# Altium PCB BOARD_4LAYER.PcbDoc (part 5 of 21)
Units mil, origin at the board's own origin, x right, y up, seen from the top; angles counter-clockwise.
Board outline 6692.91 x 10039.37 mil, 4 copper layers (Top Layer, Mid Layer 1, Mid Layer 2, Bottom Layer), stack 66.299 mil thick; 1532 components, 908 nets, 4105 pads, 1286 vias.
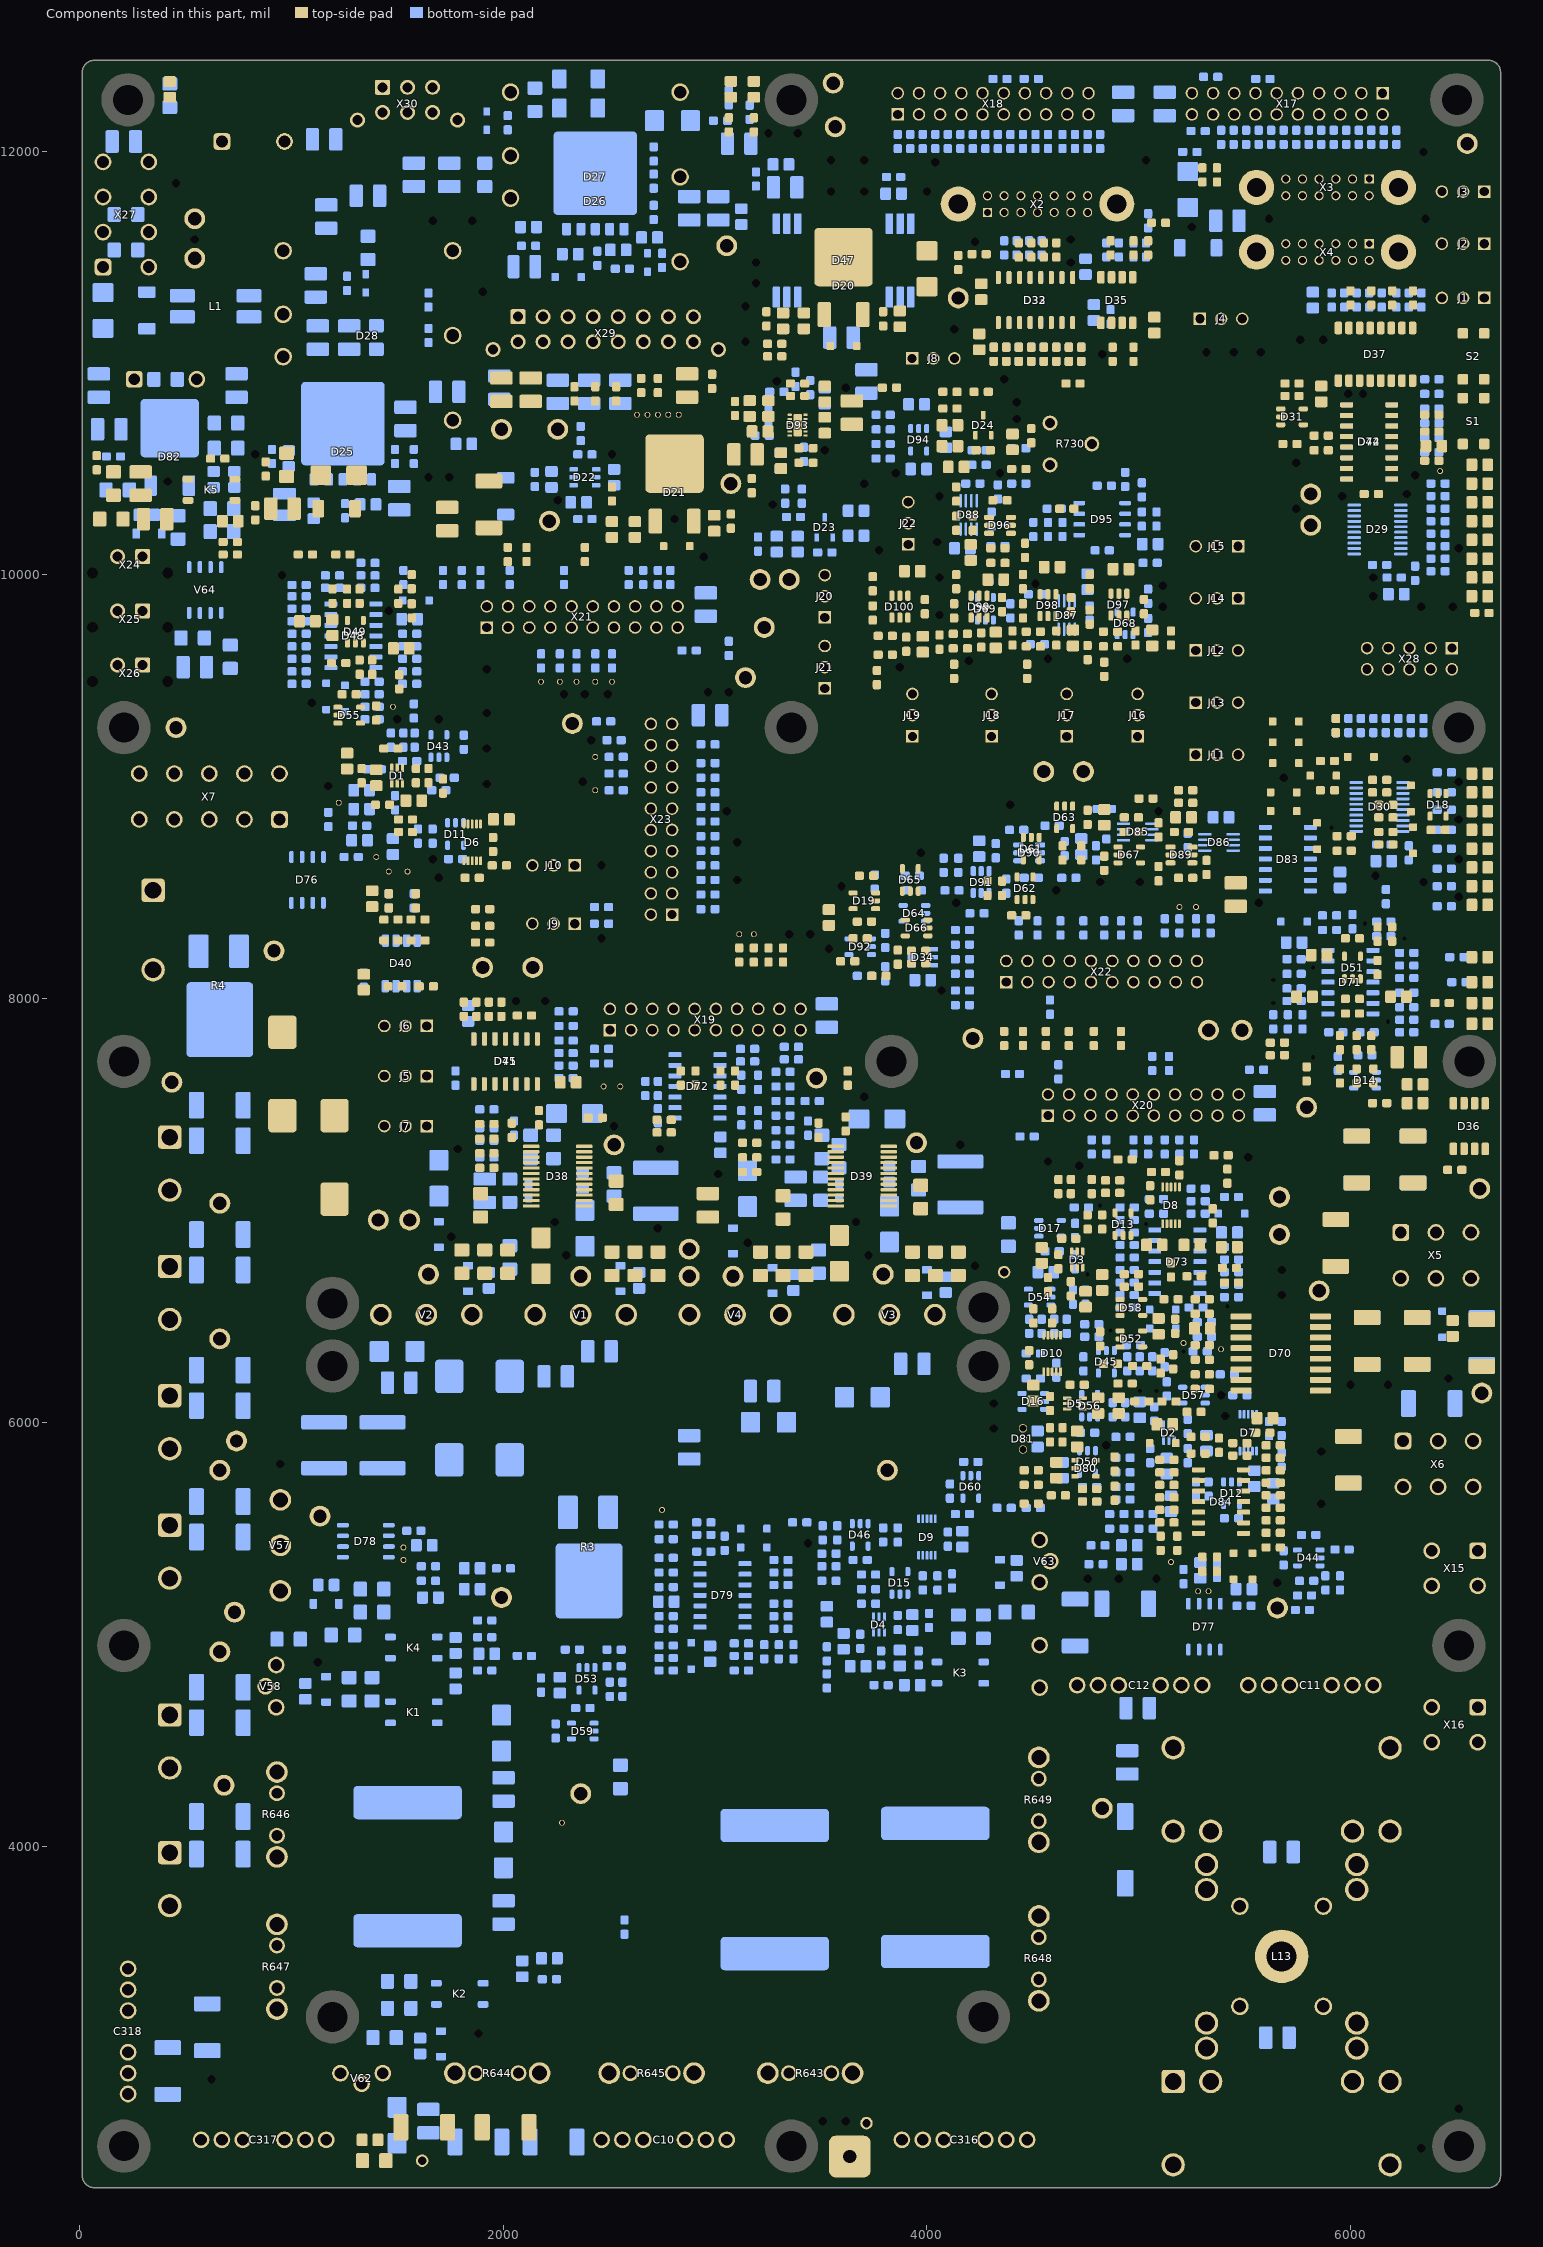
[diagram p7: the components of this part, seen from the top]

## Design rules (kind name [scope] priority, off if disabled: settings) (continued)
PolygonConnect PolygonConnect_In_$2N3800_L01_P385 [IsNamedPolygon('$2N3800_L01_P385')] p388: thpad.connectstyle=Relief thpad.reliefconductorwidth=19.68 thpad.reliefentries=4 thpad.polygonreliefangle="90 Angle" thpad.airgapwidth=9.84 smdpad.connectstyle=Relief smdpad.reliefconductorwidth=19.68 smdpad.reliefentries=4 smdpad.polygonreliefangle="90 Angle" smdpad.airgapwidth=9.84 via.connectstyle=Direct via.reliefconductorwidth=5.12 via.reliefentries=2 via.polygonreliefangle="90 Angle" via.airgapwidth=0
PolygonConnect PolygonConnect_In_$2N3800_L-01_P383 [IsNamedPolygon('$2N3800_L-01_P383')] p389: thpad.connectstyle=Relief thpad.reliefconductorwidth=19.68 thpad.reliefentries=4 thpad.polygonreliefangle="90 Angle" thpad.airgapwidth=9.84 smdpad.connectstyle=Relief smdpad.reliefconductorwidth=19.68 smdpad.reliefentries=4 smdpad.polygonreliefangle="90 Angle" smdpad.airgapwidth=9.84 via.connectstyle=Direct via.reliefconductorwidth=5.12 via.reliefentries=2 via.polygonreliefangle="90 Angle" via.airgapwidth=0
PolygonConnect PolygonConnect_In_+U_POWER_L-01_P124 [IsNamedPolygon('+U_POWER_L-01_P124')] p390: thpad.connectstyle=Relief thpad.reliefconductorwidth=19.68 thpad.reliefentries=4 thpad.polygonreliefangle="90 Angle" thpad.airgapwidth=9.84 smdpad.connectstyle=Relief smdpad.reliefconductorwidth=19.68 smdpad.reliefentries=4 smdpad.polygonreliefangle="90 Angle" smdpad.airgapwidth=9.84 via.connectstyle=Direct via.reliefconductorwidth=5.12 via.reliefentries=2 via.polygonreliefangle="90 Angle" via.airgapwidth=0
PolygonConnect PolygonConnect_In_~U_TS_L02_P133 [IsNamedPolygon('~U_TS_L02_P133')] p391: thpad.connectstyle=Relief thpad.reliefconductorwidth=19.68 thpad.reliefentries=4 thpad.polygonreliefangle="90 Angle" thpad.airgapwidth=9.84 smdpad.connectstyle=Relief smdpad.reliefconductorwidth=19.68 smdpad.reliefentries=4 smdpad.polygonreliefangle="90 Angle" smdpad.airgapwidth=9.84 via.connectstyle=Direct via.reliefconductorwidth=5.12 via.reliefentries=2 via.polygonreliefangle="90 Angle" via.airgapwidth=0
PolygonConnect PolygonConnect_In_GND_UM_L02_P614 [IsNamedPolygon('GND_UM_L02_P614')] p392: thpad.connectstyle=Relief thpad.reliefconductorwidth=19.68 thpad.reliefentries=4 thpad.polygonreliefangle="90 Angle" thpad.airgapwidth=9.84 smdpad.connectstyle=Relief smdpad.reliefconductorwidth=19.68 smdpad.reliefentries=4 smdpad.polygonreliefangle="90 Angle" smdpad.airgapwidth=9.84 via.connectstyle=Direct via.reliefconductorwidth=5.12 via.reliefentries=2 via.polygonreliefangle="90 Angle" via.airgapwidth=0
PolygonConnect PolygonConnect_In_GND_L01_P408 [IsNamedPolygon('GND_L01_P408')] p393: thpad.connectstyle=Relief thpad.reliefconductorwidth=19.68 thpad.reliefentries=4 thpad.polygonreliefangle="90 Angle" thpad.airgapwidth=9.84 smdpad.connectstyle=Relief smdpad.reliefconductorwidth=19.68 smdpad.reliefentries=4 smdpad.polygonreliefangle="90 Angle" smdpad.airgapwidth=9.84 via.connectstyle=Direct via.reliefconductorwidth=5.12 via.reliefentries=2 via.polygonreliefangle="90 Angle" via.airgapwidth=0
PolygonConnect PolygonConnect_In_PGND_L-01_P229 [IsNamedPolygon('PGND_L-01_P229')] p394: thpad.connectstyle=Relief thpad.reliefconductorwidth=19.68 thpad.reliefentries=4 thpad.polygonreliefangle="90 Angle" thpad.airgapwidth=9.84 smdpad.connectstyle=Relief smdpad.reliefconductorwidth=19.68 smdpad.reliefentries=4 smdpad.polygonreliefangle="90 Angle" smdpad.airgapwidth=9.84 via.connectstyle=Direct via.reliefconductorwidth=5.12 via.reliefentries=2 via.polygonreliefangle="90 Angle" via.airgapwidth=0
PolygonConnect PolygonConnect_In_U_MOST_L-01_P346 [IsNamedPolygon('U_MOST_L-01_P346')] p395: thpad.connectstyle=Relief thpad.reliefconductorwidth=19.68 thpad.reliefentries=4 thpad.polygonreliefangle="90 Angle" thpad.airgapwidth=9.84 smdpad.connectstyle=Relief smdpad.reliefconductorwidth=19.68 smdpad.reliefentries=4 smdpad.polygonreliefangle="90 Angle" smdpad.airgapwidth=9.84 via.connectstyle=Direct via.reliefconductorwidth=5.12 via.reliefentries=2 via.polygonreliefangle="90 Angle" via.airgapwidth=0
PolygonConnect PolygonConnect_In_$6N134_L-01_P112 [IsNamedPolygon('$6N134_L-01_P112')] p396: thpad.connectstyle=Relief thpad.reliefconductorwidth=19.68 thpad.reliefentries=4 thpad.polygonreliefangle="90 Angle" thpad.airgapwidth=9.84 smdpad.connectstyle=Relief smdpad.reliefconductorwidth=19.68 smdpad.reliefentries=4 smdpad.polygonreliefangle="90 Angle" smdpad.airgapwidth=9.84 via.connectstyle=Direct via.reliefconductorwidth=5.12 via.reliefentries=2 via.polygonreliefangle="90 Angle" via.airgapwidth=0
PolygonConnect PolygonConnect_In_PGND_L01_P252 [IsNamedPolygon('PGND_L01_P252')] p397: thpad.connectstyle=Relief thpad.reliefconductorwidth=19.68 thpad.reliefentries=4 thpad.polygonreliefangle="90 Angle" thpad.airgapwidth=9.84 smdpad.connectstyle=Relief smdpad.reliefconductorwidth=19.68 smdpad.reliefentries=4 smdpad.polygonreliefangle="90 Angle" smdpad.airgapwidth=9.84 via.connectstyle=Direct via.reliefconductorwidth=5.12 via.reliefentries=2 via.polygonreliefangle="90 Angle" via.airgapwidth=0
PolygonConnect PolygonConnect_In_I_AMP_L-01_P646 [IsNamedPolygon('I_AMP_L-01_P646')] p398: thpad.connectstyle=Relief thpad.reliefconductorwidth=19.68 thpad.reliefentries=4 thpad.polygonreliefangle="90 Angle" thpad.airgapwidth=9.84 smdpad.connectstyle=Relief smdpad.reliefconductorwidth=19.68 smdpad.reliefentries=4 smdpad.polygonreliefangle="90 Angle" smdpad.airgapwidth=9.84 via.connectstyle=Direct via.reliefconductorwidth=5.12 via.reliefentries=2 via.polygonreliefangle="90 Angle" via.airgapwidth=0
PolygonConnect PolygonConnect_In_PGND_L01_P267 [IsNamedPolygon('PGND_L01_P267')] p399: thpad.connectstyle=Relief thpad.reliefconductorwidth=19.68 thpad.reliefentries=4 thpad.polygonreliefangle="90 Angle" thpad.airgapwidth=9.84 smdpad.connectstyle=Relief smdpad.reliefconductorwidth=19.68 smdpad.reliefentries=4 smdpad.polygonreliefangle="90 Angle" smdpad.airgapwidth=9.84 via.connectstyle=Direct via.reliefconductorwidth=5.12 via.reliefentries=2 via.polygonreliefangle="90 Angle" via.airgapwidth=0
PolygonConnect PolygonConnect_In_PGND_L-01_P204 [IsNamedPolygon('PGND_L-01_P204')] p400: thpad.connectstyle=Relief thpad.reliefconductorwidth=19.68 thpad.reliefentries=4 thpad.polygonreliefangle="90 Angle" thpad.airgapwidth=9.84 smdpad.connectstyle=Relief smdpad.reliefconductorwidth=19.68 smdpad.reliefentries=4 smdpad.polygonreliefangle="90 Angle" smdpad.airgapwidth=9.84 via.connectstyle=Direct via.reliefconductorwidth=5.12 via.reliefentries=2 via.polygonreliefangle="90 Angle" via.airgapwidth=0
PolygonConnect PolygonConnect_In_PGND_L-01_P179 [IsNamedPolygon('PGND_L-01_P179')] p401: thpad.connectstyle=Relief thpad.reliefconductorwidth=19.68 thpad.reliefentries=4 thpad.polygonreliefangle="90 Angle" thpad.airgapwidth=9.84 smdpad.connectstyle=Relief smdpad.reliefconductorwidth=19.68 smdpad.reliefentries=4 smdpad.polygonreliefangle="90 Angle" smdpad.airgapwidth=9.84 via.connectstyle=Direct via.reliefconductorwidth=5.12 via.reliefentries=2 via.polygonreliefangle="90 Angle" via.airgapwidth=0
PolygonConnect PolygonConnect_In_-U_AMP_L01_P009 [IsNamedPolygon('-U_AMP_L01_P009')] p402: thpad.connectstyle=Relief thpad.reliefconductorwidth=19.68 thpad.reliefentries=4 thpad.polygonreliefangle="90 Angle" thpad.airgapwidth=9.84 smdpad.connectstyle=Relief smdpad.reliefconductorwidth=19.68 smdpad.reliefentries=4 smdpad.polygonreliefangle="90 Angle" smdpad.airgapwidth=9.84 via.connectstyle=Direct via.reliefconductorwidth=5.12 via.reliefentries=2 via.polygonreliefangle="90 Angle" via.airgapwidth=0
PolygonConnect PolygonConnect_In_PGND_L01_P224 [IsNamedPolygon('PGND_L01_P224')] p403: thpad.connectstyle=Relief thpad.reliefconductorwidth=19.68 thpad.reliefentries=4 thpad.polygonreliefangle="90 Angle" thpad.airgapwidth=9.84 smdpad.connectstyle=Relief smdpad.reliefconductorwidth=19.68 smdpad.reliefentries=4 smdpad.polygonreliefangle="90 Angle" smdpad.airgapwidth=9.84 via.connectstyle=Direct via.reliefconductorwidth=5.12 via.reliefentries=2 via.polygonreliefangle="90 Angle" via.airgapwidth=0
PolygonConnect PolygonConnect_In_GND_UM_L-01_P594 [IsNamedPolygon('GND_UM_L-01_P594')] p404: thpad.connectstyle=Relief thpad.reliefconductorwidth=19.68 thpad.reliefentries=4 thpad.polygonreliefangle="90 Angle" thpad.airgapwidth=9.84 smdpad.connectstyle=Relief smdpad.reliefconductorwidth=19.68 smdpad.reliefentries=4 smdpad.polygonreliefangle="90 Angle" smdpad.airgapwidth=9.84 via.connectstyle=Direct via.reliefconductorwidth=5.12 via.reliefentries=2 via.polygonreliefangle="90 Angle" via.airgapwidth=0
PolygonConnect PolygonConnect_In_$4N4005_L02_P557 [IsNamedPolygon('$4N4005_L02_P557')] p405: thpad.connectstyle=Relief thpad.reliefconductorwidth=19.68 thpad.reliefentries=4 thpad.polygonreliefangle="90 Angle" thpad.airgapwidth=9.84 smdpad.connectstyle=Relief smdpad.reliefconductorwidth=19.68 smdpad.reliefentries=4 smdpad.polygonreliefangle="90 Angle" smdpad.airgapwidth=9.84 via.connectstyle=Direct via.reliefconductorwidth=5.12 via.reliefentries=2 via.polygonreliefangle="90 Angle" via.airgapwidth=0
PolygonConnect PolygonConnect_In_-U_UM_L02_P494 [IsNamedPolygon('-U_UM_L02_P494')] p406: thpad.connectstyle=Relief thpad.reliefconductorwidth=19.68 thpad.reliefentries=4 thpad.polygonreliefangle="90 Angle" thpad.airgapwidth=9.84 smdpad.connectstyle=Relief smdpad.reliefconductorwidth=19.68 smdpad.reliefentries=4 smdpad.polygonreliefangle="90 Angle" smdpad.airgapwidth=9.84 via.connectstyle=Direct via.reliefconductorwidth=5.12 via.reliefentries=2 via.polygonreliefangle="90 Angle" via.airgapwidth=0
PolygonConnect PolygonConnect_In_$2N2430_L02_P349 [IsNamedPolygon('$2N2430_L02_P349')] p407: thpad.connectstyle=Relief thpad.reliefconductorwidth=19.68 thpad.reliefentries=4 thpad.polygonreliefangle="90 Angle" thpad.airgapwidth=9.84 smdpad.connectstyle=Relief smdpad.reliefconductorwidth=19.68 smdpad.reliefentries=4 smdpad.polygonreliefangle="90 Angle" smdpad.airgapwidth=9.84 via.connectstyle=Direct via.reliefconductorwidth=5.12 via.reliefentries=2 via.polygonreliefangle="90 Angle" via.airgapwidth=0
PolygonConnect PolygonConnect_In_U_MOST_L01_P342 [IsNamedPolygon('U_MOST_L01_P342')] p408: thpad.connectstyle=Relief thpad.reliefconductorwidth=19.68 thpad.reliefentries=4 thpad.polygonreliefangle="90 Angle" thpad.airgapwidth=9.84 smdpad.connectstyle=Relief smdpad.reliefconductorwidth=19.68 smdpad.reliefentries=4 smdpad.polygonreliefangle="90 Angle" smdpad.airgapwidth=9.84 via.connectstyle=Direct via.reliefconductorwidth=5.12 via.reliefentries=2 via.polygonreliefangle="90 Angle" via.airgapwidth=0
PolygonConnect PolygonConnect_In_$4N4003_L02_P649 [IsNamedPolygon('$4N4003_L02_P649')] p409: thpad.connectstyle=Relief thpad.reliefconductorwidth=19.68 thpad.reliefentries=4 thpad.polygonreliefangle="90 Angle" thpad.airgapwidth=9.84 smdpad.connectstyle=Relief smdpad.reliefconductorwidth=19.68 smdpad.reliefentries=4 smdpad.polygonreliefangle="90 Angle" smdpad.airgapwidth=9.84 via.connectstyle=Direct via.reliefconductorwidth=5.12 via.reliefentries=2 via.polygonreliefangle="90 Angle" via.airgapwidth=0
PolygonConnect PolygonConnect_In_GND_L01_P430 [IsNamedPolygon('GND_L01_P430')] p410: thpad.connectstyle=Relief thpad.reliefconductorwidth=19.68 thpad.reliefentries=4 thpad.polygonreliefangle="90 Angle" thpad.airgapwidth=9.84 smdpad.connectstyle=Relief smdpad.reliefconductorwidth=19.68 smdpad.reliefentries=4 smdpad.polygonreliefangle="90 Angle" smdpad.airgapwidth=9.84 via.connectstyle=Direct via.reliefconductorwidth=5.12 via.reliefentries=2 via.polygonreliefangle="90 Angle" via.airgapwidth=0
PolygonConnect PolygonConnect_In_-U_AMP_L-01_P008 [IsNamedPolygon('-U_AMP_L-01_P008')] p411: thpad.connectstyle=Relief thpad.reliefconductorwidth=19.68 thpad.reliefentries=4 thpad.polygonreliefangle="90 Angle" thpad.airgapwidth=9.84 smdpad.connectstyle=Relief smdpad.reliefconductorwidth=19.68 smdpad.reliefentries=4 smdpad.polygonreliefangle="90 Angle" smdpad.airgapwidth=9.84 via.connectstyle=Direct via.reliefconductorwidth=5.12 via.reliefentries=2 via.polygonreliefangle="90 Angle" via.airgapwidth=0
PolygonConnect PolygonConnect_In_PGND_L01_P298 [IsNamedPolygon('PGND_L01_P298')] p412: thpad.connectstyle=Relief thpad.reliefconductorwidth=19.68 thpad.reliefentries=4 thpad.polygonreliefangle="90 Angle" thpad.airgapwidth=9.84 smdpad.connectstyle=Relief smdpad.reliefconductorwidth=19.68 smdpad.reliefentries=4 smdpad.polygonreliefangle="90 Angle" smdpad.airgapwidth=9.84 via.connectstyle=Direct via.reliefconductorwidth=5.12 via.reliefentries=2 via.polygonreliefangle="90 Angle" via.airgapwidth=0
PolygonConnect PolygonConnect_In_$2N2408_L02_P166 [IsNamedPolygon('$2N2408_L02_P166')] p413: thpad.connectstyle=Relief thpad.reliefconductorwidth=19.68 thpad.reliefentries=4 thpad.polygonreliefangle="90 Angle" thpad.airgapwidth=9.84 smdpad.connectstyle=Relief smdpad.reliefconductorwidth=19.68 smdpad.reliefentries=4 smdpad.polygonreliefangle="90 Angle" smdpad.airgapwidth=9.84 via.connectstyle=Direct via.reliefconductorwidth=5.12 via.reliefentries=2 via.polygonreliefangle="90 Angle" via.airgapwidth=0
PolygonConnect PolygonConnect_In_GND_UM_L01_P624 [IsNamedPolygon('GND_UM_L01_P624')] p414: thpad.connectstyle=Relief thpad.reliefconductorwidth=19.68 thpad.reliefentries=4 thpad.polygonreliefangle="90 Angle" thpad.airgapwidth=9.84 smdpad.connectstyle=Relief smdpad.reliefconductorwidth=19.68 smdpad.reliefentries=4 smdpad.polygonreliefangle="90 Angle" smdpad.airgapwidth=9.84 via.connectstyle=Direct via.reliefconductorwidth=5.12 via.reliefentries=2 via.polygonreliefangle="90 Angle" via.airgapwidth=0
PolygonConnect PolygonConnect_In_GND_L02_P450 [IsNamedPolygon('GND_L02_P450')] p415: thpad.connectstyle=Relief thpad.reliefconductorwidth=19.68 thpad.reliefentries=4 thpad.polygonreliefangle="90 Angle" thpad.airgapwidth=9.84 smdpad.connectstyle=Relief smdpad.reliefconductorwidth=19.68 smdpad.reliefentries=4 smdpad.polygonreliefangle="90 Angle" smdpad.airgapwidth=9.84 via.connectstyle=Direct via.reliefconductorwidth=5.12 via.reliefentries=2 via.polygonreliefangle="90 Angle" via.airgapwidth=0
PolygonConnect PolygonConnect_In_$4N2811_L01_P585 [IsNamedPolygon('$4N2811_L01_P585')] p416: thpad.connectstyle=Relief thpad.reliefconductorwidth=19.68 thpad.reliefentries=4 thpad.polygonreliefangle="90 Angle" thpad.airgapwidth=9.84 smdpad.connectstyle=Relief smdpad.reliefconductorwidth=19.68 smdpad.reliefentries=4 smdpad.polygonreliefangle="90 Angle" smdpad.airgapwidth=9.84 via.connectstyle=Direct via.reliefconductorwidth=5.12 via.reliefentries=2 via.polygonreliefangle="90 Angle" via.airgapwidth=0
PolygonConnect PolygonConnect_In_I_MOST_L-01_P332 [IsNamedPolygon('I_MOST_L-01_P332')] p417: thpad.connectstyle=Relief thpad.reliefconductorwidth=19.68 thpad.reliefentries=4 thpad.polygonreliefangle="90 Angle" thpad.airgapwidth=9.84 smdpad.connectstyle=Relief smdpad.reliefconductorwidth=19.68 smdpad.reliefentries=4 smdpad.polygonreliefangle="90 Angle" smdpad.airgapwidth=9.84 via.connectstyle=Direct via.reliefconductorwidth=5.12 via.reliefentries=2 via.polygonreliefangle="90 Angle" via.airgapwidth=0
PolygonConnect PolygonConnect_In_$6N94_L-01_P032 [IsNamedPolygon('$6N94_L-01_P032')] p418: thpad.connectstyle=Relief thpad.reliefconductorwidth=19.68 thpad.reliefentries=4 thpad.polygonreliefangle="90 Angle" thpad.airgapwidth=9.84 smdpad.connectstyle=Relief smdpad.reliefconductorwidth=19.68 smdpad.reliefentries=4 smdpad.polygonreliefangle="90 Angle" smdpad.airgapwidth=9.84 via.connectstyle=Direct via.reliefconductorwidth=5.12 via.reliefentries=2 via.polygonreliefangle="90 Angle" via.airgapwidth=0
PolygonConnect PolygonConnect_In_UH_L-01_P327 [IsNamedPolygon('UH_L-01_P327')] p419: thpad.connectstyle=Relief thpad.reliefconductorwidth=19.68 thpad.reliefentries=4 thpad.polygonreliefangle="90 Angle" thpad.airgapwidth=9.84 smdpad.connectstyle=Relief smdpad.reliefconductorwidth=19.68 smdpad.reliefentries=4 smdpad.polygonreliefangle="90 Angle" smdpad.airgapwidth=9.84 via.connectstyle=Direct via.reliefconductorwidth=5.12 via.reliefentries=2 via.polygonreliefangle="90 Angle" via.airgapwidth=0
PolygonConnect PolygonConnect_In_$4N2806_L01_P576 [IsNamedPolygon('$4N2806_L01_P576')] p420: thpad.connectstyle=Relief thpad.reliefconductorwidth=19.68 thpad.reliefentries=4 thpad.polygonreliefangle="90 Angle" thpad.airgapwidth=9.84 smdpad.connectstyle=Relief smdpad.reliefconductorwidth=19.68 smdpad.reliefentries=4 smdpad.polygonreliefangle="90 Angle" smdpad.airgapwidth=9.84 via.connectstyle=Direct via.reliefconductorwidth=5.12 via.reliefentries=2 via.polygonreliefangle="90 Angle" via.airgapwidth=0
PolygonConnect PolygonConnect_In_+U_VENT_L02_P511 [IsNamedPolygon('+U_VENT_L02_P511')] p421: thpad.connectstyle=Relief thpad.reliefconductorwidth=19.68 thpad.reliefentries=4 thpad.polygonreliefangle="90 Angle" thpad.airgapwidth=9.84 smdpad.connectstyle=Relief smdpad.reliefconductorwidth=19.68 smdpad.reliefentries=4 smdpad.polygonreliefangle="90 Angle" smdpad.airgapwidth=9.84 via.connectstyle=Direct via.reliefconductorwidth=5.12 via.reliefentries=2 via.polygonreliefangle="90 Angle" via.airgapwidth=0
PolygonConnect PolygonConnect_In_GND_L01_P444 [IsNamedPolygon('GND_L01_P444')] p422: thpad.connectstyle=Relief thpad.reliefconductorwidth=19.68 thpad.reliefentries=4 thpad.polygonreliefangle="90 Angle" thpad.airgapwidth=9.84 smdpad.connectstyle=Relief smdpad.reliefconductorwidth=19.68 smdpad.reliefentries=4 smdpad.polygonreliefangle="90 Angle" smdpad.airgapwidth=9.84 via.connectstyle=Direct via.reliefconductorwidth=5.12 via.reliefentries=2 via.polygonreliefangle="90 Angle" via.airgapwidth=0
PolygonConnect PolygonConnect_In_GND_L01_P437 [IsNamedPolygon('GND_L01_P437')] p423: thpad.connectstyle=Relief thpad.reliefconductorwidth=19.68 thpad.reliefentries=4 thpad.polygonreliefangle="90 Angle" thpad.airgapwidth=9.84 smdpad.connectstyle=Relief smdpad.reliefconductorwidth=19.68 smdpad.reliefentries=4 smdpad.polygonreliefangle="90 Angle" smdpad.airgapwidth=9.84 via.connectstyle=Direct via.reliefconductorwidth=5.12 via.reliefentries=2 via.polygonreliefangle="90 Angle" via.airgapwidth=0
PolygonConnect PolygonConnect_In_PGND_L-01_P250 [IsNamedPolygon('PGND_L-01_P250')] p424: thpad.connectstyle=Relief thpad.reliefconductorwidth=19.68 thpad.reliefentries=4 thpad.polygonreliefangle="90 Angle" thpad.airgapwidth=9.84 smdpad.connectstyle=Relief smdpad.reliefconductorwidth=19.68 smdpad.reliefentries=4 smdpad.polygonreliefangle="90 Angle" smdpad.airgapwidth=9.84 via.connectstyle=Direct via.reliefconductorwidth=5.12 via.reliefentries=2 via.polygonreliefangle="90 Angle" via.airgapwidth=0
PolygonConnect PolygonConnect_In_U_FIN_L02_P137 [IsNamedPolygon('U_FIN_L02_P137')] p425: thpad.connectstyle=Relief thpad.reliefconductorwidth=19.68 thpad.reliefentries=4 thpad.polygonreliefangle="90 Angle" thpad.airgapwidth=9.84 smdpad.connectstyle=Relief smdpad.reliefconductorwidth=19.68 smdpad.reliefentries=4 smdpad.polygonreliefangle="90 Angle" smdpad.airgapwidth=9.84 via.connectstyle=Direct via.reliefconductorwidth=5.12 via.reliefentries=2 via.polygonreliefangle="90 Angle" via.airgapwidth=0
PolygonConnect PolygonConnect_In_$4N4014_L-01_P563 [IsNamedPolygon('$4N4014_L-01_P563')] p426: thpad.connectstyle=Relief thpad.reliefconductorwidth=19.68 thpad.reliefentries=4 thpad.polygonreliefangle="90 Angle" thpad.airgapwidth=9.84 smdpad.connectstyle=Relief smdpad.reliefconductorwidth=19.68 smdpad.reliefentries=4 smdpad.polygonreliefangle="90 Angle" smdpad.airgapwidth=9.84 via.connectstyle=Direct via.reliefconductorwidth=5.12 via.reliefentries=2 via.polygonreliefangle="90 Angle" via.airgapwidth=0
PolygonConnect PolygonConnect_In_+U_POWER_L02_P127 [IsNamedPolygon('+U_POWER_L02_P127')] p427: thpad.connectstyle=Relief thpad.reliefconductorwidth=19.68 thpad.reliefentries=4 thpad.polygonreliefangle="90 Angle" thpad.airgapwidth=9.84 smdpad.connectstyle=Relief smdpad.reliefconductorwidth=19.68 smdpad.reliefentries=4 smdpad.polygonreliefangle="90 Angle" smdpad.airgapwidth=9.84 via.connectstyle=Direct via.reliefconductorwidth=5.12 via.reliefentries=2 via.polygonreliefangle="90 Angle" via.airgapwidth=0
PolygonConnect PolygonConnect_In_GND_L01_P445 [IsNamedPolygon('GND_L01_P445')] p428: thpad.connectstyle=Relief thpad.reliefconductorwidth=19.68 thpad.reliefentries=4 thpad.polygonreliefangle="90 Angle" thpad.airgapwidth=9.84 smdpad.connectstyle=Relief smdpad.reliefconductorwidth=19.68 smdpad.reliefentries=4 smdpad.polygonreliefangle="90 Angle" smdpad.airgapwidth=9.84 via.connectstyle=Direct via.reliefconductorwidth=5.12 via.reliefentries=2 via.polygonreliefangle="90 Angle" via.airgapwidth=0
PolygonConnect PolygonConnect_In_GND_L01_P417 [IsNamedPolygon('GND_L01_P417')] p429: thpad.connectstyle=Relief thpad.reliefconductorwidth=19.68 thpad.reliefentries=4 thpad.polygonreliefangle="90 Angle" thpad.airgapwidth=9.84 smdpad.connectstyle=Relief smdpad.reliefconductorwidth=19.68 smdpad.reliefentries=4 smdpad.polygonreliefangle="90 Angle" smdpad.airgapwidth=9.84 via.connectstyle=Direct via.reliefconductorwidth=5.12 via.reliefentries=2 via.polygonreliefangle="90 Angle" via.airgapwidth=0
PolygonConnect PolygonConnect_In_+U_VENT_L-01_P505 [IsNamedPolygon('+U_VENT_L-01_P505')] p430: thpad.connectstyle=Relief thpad.reliefconductorwidth=19.68 thpad.reliefentries=4 thpad.polygonreliefangle="90 Angle" thpad.airgapwidth=9.84 smdpad.connectstyle=Relief smdpad.reliefconductorwidth=19.68 smdpad.reliefentries=4 smdpad.polygonreliefangle="90 Angle" smdpad.airgapwidth=9.84 via.connectstyle=Direct via.reliefconductorwidth=5.12 via.reliefentries=2 via.polygonreliefangle="90 Angle" via.airgapwidth=0
PolygonConnect PolygonConnect_In_$4N4014_L01_P562 [IsNamedPolygon('$4N4014_L01_P562')] p431: thpad.connectstyle=Relief thpad.reliefconductorwidth=19.68 thpad.reliefentries=4 thpad.polygonreliefangle="90 Angle" thpad.airgapwidth=9.84 smdpad.connectstyle=Relief smdpad.reliefconductorwidth=19.68 smdpad.reliefentries=4 smdpad.polygonreliefangle="90 Angle" smdpad.airgapwidth=9.84 via.connectstyle=Direct via.reliefconductorwidth=5.12 via.reliefentries=2 via.polygonreliefangle="90 Angle" via.airgapwidth=0
PolygonConnect PolygonConnect_In_$6N106_L02_P062 [IsNamedPolygon('$6N106_L02_P062')] p432: thpad.connectstyle=Relief thpad.reliefconductorwidth=19.68 thpad.reliefentries=4 thpad.polygonreliefangle="90 Angle" thpad.airgapwidth=9.84 smdpad.connectstyle=Relief smdpad.reliefconductorwidth=19.68 smdpad.reliefentries=4 smdpad.polygonreliefangle="90 Angle" smdpad.airgapwidth=9.84 via.connectstyle=Direct via.reliefconductorwidth=5.12 via.reliefentries=2 via.polygonreliefangle="90 Angle" via.airgapwidth=0
PolygonConnect PolygonConnect_In_GND_UM_L-01_P593 [IsNamedPolygon('GND_UM_L-01_P593')] p433: thpad.connectstyle=Relief thpad.reliefconductorwidth=19.68 thpad.reliefentries=4 thpad.polygonreliefangle="90 Angle" thpad.airgapwidth=9.84 smdpad.connectstyle=Relief smdpad.reliefconductorwidth=19.68 smdpad.reliefentries=4 smdpad.polygonreliefangle="90 Angle" smdpad.airgapwidth=9.84 via.connectstyle=Direct via.reliefconductorwidth=5.12 via.reliefentries=2 via.polygonreliefangle="90 Angle" via.airgapwidth=0
PolygonConnect PolygonConnect_In_U_MOST_L02_P339 [IsNamedPolygon('U_MOST_L02_P339')] p434: thpad.connectstyle=Relief thpad.reliefconductorwidth=19.68 thpad.reliefentries=4 thpad.polygonreliefangle="90 Angle" thpad.airgapwidth=9.84 smdpad.connectstyle=Relief smdpad.reliefconductorwidth=19.68 smdpad.reliefentries=4 smdpad.polygonreliefangle="90 Angle" smdpad.airgapwidth=9.84 via.connectstyle=Direct via.reliefconductorwidth=5.12 via.reliefentries=2 via.polygonreliefangle="90 Angle" via.airgapwidth=0
PolygonConnect PolygonConnect_In_$2N2430_L-01_P350 [IsNamedPolygon('$2N2430_L-01_P350')] p435: thpad.connectstyle=Relief thpad.reliefconductorwidth=19.68 thpad.reliefentries=4 thpad.polygonreliefangle="90 Angle" thpad.airgapwidth=9.84 smdpad.connectstyle=Relief smdpad.reliefconductorwidth=19.68 smdpad.reliefentries=4 smdpad.polygonreliefangle="90 Angle" smdpad.airgapwidth=9.84 via.connectstyle=Direct via.reliefconductorwidth=5.12 via.reliefentries=2 via.polygonreliefangle="90 Angle" via.airgapwidth=0
PolygonConnect PolygonConnect_In_+U_AMP_L02_P043 [IsNamedPolygon('+U_AMP_L02_P043')] p436: thpad.connectstyle=Relief thpad.reliefconductorwidth=19.68 thpad.reliefentries=4 thpad.polygonreliefangle="90 Angle" thpad.airgapwidth=9.84 smdpad.connectstyle=Relief smdpad.reliefconductorwidth=19.68 smdpad.reliefentries=4 smdpad.polygonreliefangle="90 Angle" smdpad.airgapwidth=9.84 via.connectstyle=Direct via.reliefconductorwidth=5.12 via.reliefentries=2 via.polygonreliefangle="90 Angle" via.airgapwidth=0
PolygonConnect PolygonConnect_In_$6N135_L01_P093 [IsNamedPolygon('$6N135_L01_P093')] p437: thpad.connectstyle=Relief thpad.reliefconductorwidth=19.68 thpad.reliefentries=4 thpad.polygonreliefangle="90 Angle" thpad.airgapwidth=9.84 smdpad.connectstyle=Relief smdpad.reliefconductorwidth=19.68 smdpad.reliefentries=4 smdpad.polygonreliefangle="90 Angle" smdpad.airgapwidth=9.84 via.connectstyle=Direct via.reliefconductorwidth=5.12 via.reliefentries=2 via.polygonreliefangle="90 Angle" via.airgapwidth=0
PolygonConnect PolygonConnect_In_$6N106_L-01_P057 [IsNamedPolygon('$6N106_L-01_P057')] p438: thpad.connectstyle=Relief thpad.reliefconductorwidth=19.68 thpad.reliefentries=4 thpad.polygonreliefangle="90 Angle" thpad.airgapwidth=9.84 smdpad.connectstyle=Relief smdpad.reliefconductorwidth=19.68 smdpad.reliefentries=4 smdpad.polygonreliefangle="90 Angle" smdpad.airgapwidth=9.84 via.connectstyle=Direct via.reliefconductorwidth=5.12 via.reliefentries=2 via.polygonreliefangle="90 Angle" via.airgapwidth=0
PolygonConnect PolygonConnect_In_GND_L01_P441 [IsNamedPolygon('GND_L01_P441')] p439: thpad.connectstyle=Relief thpad.reliefconductorwidth=19.68 thpad.reliefentries=4 thpad.polygonreliefangle="90 Angle" thpad.airgapwidth=9.84 smdpad.connectstyle=Relief smdpad.reliefconductorwidth=19.68 smdpad.reliefentries=4 smdpad.polygonreliefangle="90 Angle" smdpad.airgapwidth=9.84 via.connectstyle=Direct via.reliefconductorwidth=5.12 via.reliefentries=2 via.polygonreliefangle="90 Angle" via.airgapwidth=0
PolygonConnect PolygonConnect_In_$6N134_L-01_P114 [IsNamedPolygon('$6N134_L-01_P114')] p440: thpad.connectstyle=Relief thpad.reliefconductorwidth=19.68 thpad.reliefentries=4 thpad.polygonreliefangle="90 Angle" thpad.airgapwidth=9.84 smdpad.connectstyle=Relief smdpad.reliefconductorwidth=19.68 smdpad.reliefentries=4 smdpad.polygonreliefangle="90 Angle" smdpad.airgapwidth=9.84 via.connectstyle=Direct via.reliefconductorwidth=5.12 via.reliefentries=2 via.polygonreliefangle="90 Angle" via.airgapwidth=0
PolygonConnect PolygonConnect_In_PGND_L01_P286 [IsNamedPolygon('PGND_L01_P286')] p441: thpad.connectstyle=Relief thpad.reliefconductorwidth=19.68 thpad.reliefentries=4 thpad.polygonreliefangle="90 Angle" thpad.airgapwidth=9.84 smdpad.connectstyle=Relief smdpad.reliefconductorwidth=19.68 smdpad.reliefentries=4 smdpad.polygonreliefangle="90 Angle" smdpad.airgapwidth=9.84 via.connectstyle=Direct via.reliefconductorwidth=5.12 via.reliefentries=2 via.polygonreliefangle="90 Angle" via.airgapwidth=0
PolygonConnect PolygonConnect_In_$4N2811_L02_P584 [IsNamedPolygon('$4N2811_L02_P584')] p442: thpad.connectstyle=Relief thpad.reliefconductorwidth=19.68 thpad.reliefentries=4 thpad.polygonreliefangle="90 Angle" thpad.airgapwidth=9.84 smdpad.connectstyle=Relief smdpad.reliefconductorwidth=19.68 smdpad.reliefentries=4 smdpad.polygonreliefangle="90 Angle" smdpad.airgapwidth=9.84 via.connectstyle=Direct via.reliefconductorwidth=5.12 via.reliefentries=2 via.polygonreliefangle="90 Angle" via.airgapwidth=0
PolygonConnect PolygonConnect_In_GND_L01_P448 [IsNamedPolygon('GND_L01_P448')] p443: thpad.connectstyle=Relief thpad.reliefconductorwidth=19.68 thpad.reliefentries=4 thpad.polygonreliefangle="90 Angle" thpad.airgapwidth=9.84 smdpad.connectstyle=Relief smdpad.reliefconductorwidth=19.68 smdpad.reliefentries=4 smdpad.polygonreliefangle="90 Angle" smdpad.airgapwidth=9.84 via.connectstyle=Direct via.reliefconductorwidth=5.12 via.reliefentries=2 via.polygonreliefangle="90 Angle" via.airgapwidth=0
PolygonConnect PolygonConnect_In_PGND_L-01_P242 [IsNamedPolygon('PGND_L-01_P242')] p444: thpad.connectstyle=Relief thpad.reliefconductorwidth=19.68 thpad.reliefentries=4 thpad.polygonreliefangle="90 Angle" thpad.airgapwidth=9.84 smdpad.connectstyle=Relief smdpad.reliefconductorwidth=19.68 smdpad.reliefentries=4 smdpad.polygonreliefangle="90 Angle" smdpad.airgapwidth=9.84 via.connectstyle=Direct via.reliefconductorwidth=5.12 via.reliefentries=2 via.polygonreliefangle="90 Angle" via.airgapwidth=0
PolygonConnect PolygonConnect_In_$6N135_L-01_P096 [IsNamedPolygon('$6N135_L-01_P096')] p445: thpad.connectstyle=Relief thpad.reliefconductorwidth=19.68 thpad.reliefentries=4 thpad.polygonreliefangle="90 Angle" thpad.airgapwidth=9.84 smdpad.connectstyle=Relief smdpad.reliefconductorwidth=19.68 smdpad.reliefentries=4 smdpad.polygonreliefangle="90 Angle" smdpad.airgapwidth=9.84 via.connectstyle=Direct via.reliefconductorwidth=5.12 via.reliefentries=2 via.polygonreliefangle="90 Angle" via.airgapwidth=0
PolygonConnect PolygonConnect_In_$4N4016_L-01_P541 [IsNamedPolygon('$4N4016_L-01_P541')] p446: thpad.connectstyle=Relief thpad.reliefconductorwidth=19.68 thpad.reliefentries=4 thpad.polygonreliefangle="90 Angle" thpad.airgapwidth=9.84 smdpad.connectstyle=Relief smdpad.reliefconductorwidth=19.68 smdpad.reliefentries=4 smdpad.polygonreliefangle="90 Angle" smdpad.airgapwidth=9.84 via.connectstyle=Direct via.reliefconductorwidth=5.12 via.reliefentries=2 via.polygonreliefangle="90 Angle" via.airgapwidth=0
PolygonConnect PolygonConnect_In_PGND_L02_P183 [IsNamedPolygon('PGND_L02_P183')] p447: thpad.connectstyle=Relief thpad.reliefconductorwidth=19.68 thpad.reliefentries=4 thpad.polygonreliefangle="90 Angle" thpad.airgapwidth=9.84 smdpad.connectstyle=Relief smdpad.reliefconductorwidth=19.68 smdpad.reliefentries=4 smdpad.polygonreliefangle="90 Angle" smdpad.airgapwidth=9.84 via.connectstyle=Direct via.reliefconductorwidth=5.12 via.reliefentries=2 via.polygonreliefangle="90 Angle" via.airgapwidth=0
PolygonConnect PolygonConnect_In_$4N2816_L01_P499 [IsNamedPolygon('$4N2816_L01_P499')] p448: thpad.connectstyle=Relief thpad.reliefconductorwidth=19.68 thpad.reliefentries=4 thpad.polygonreliefangle="90 Angle" thpad.airgapwidth=9.84 smdpad.connectstyle=Relief smdpad.reliefconductorwidth=19.68 smdpad.reliefentries=4 smdpad.polygonreliefangle="90 Angle" smdpad.airgapwidth=9.84 via.connectstyle=Direct via.reliefconductorwidth=5.12 via.reliefentries=2 via.polygonreliefangle="90 Angle" via.airgapwidth=0
PolygonConnect PolygonConnect_In_GND_UM_L02_P602 [IsNamedPolygon('GND_UM_L02_P602')] p449: thpad.connectstyle=Relief thpad.reliefconductorwidth=19.68 thpad.reliefentries=4 thpad.polygonreliefangle="90 Angle" thpad.airgapwidth=9.84 smdpad.connectstyle=Relief smdpad.reliefconductorwidth=19.68 smdpad.reliefentries=4 smdpad.polygonreliefangle="90 Angle" smdpad.airgapwidth=9.84 via.connectstyle=Direct via.reliefconductorwidth=5.12 via.reliefentries=2 via.polygonreliefangle="90 Angle" via.airgapwidth=0
PolygonConnect PolygonConnect_In_GND_L02_P460 [IsNamedPolygon('GND_L02_P460')] p450: thpad.connectstyle=Relief thpad.reliefconductorwidth=19.68 thpad.reliefentries=4 thpad.polygonreliefangle="90 Angle" thpad.airgapwidth=9.84 smdpad.connectstyle=Relief smdpad.reliefconductorwidth=19.68 smdpad.reliefentries=4 smdpad.polygonreliefangle="90 Angle" smdpad.airgapwidth=9.84 via.connectstyle=Direct via.reliefconductorwidth=5.12 via.reliefentries=2 via.polygonreliefangle="90 Angle" via.airgapwidth=0
PolygonConnect PolygonConnect_In_I_MOST_L01_P334 [IsNamedPolygon('I_MOST_L01_P334')] p451: thpad.connectstyle=Relief thpad.reliefconductorwidth=19.68 thpad.reliefentries=4 thpad.polygonreliefangle="90 Angle" thpad.airgapwidth=9.84 smdpad.connectstyle=Relief smdpad.reliefconductorwidth=19.68 smdpad.reliefentries=4 smdpad.polygonreliefangle="90 Angle" smdpad.airgapwidth=9.84 via.connectstyle=Direct via.reliefconductorwidth=5.12 via.reliefentries=2 via.polygonreliefangle="90 Angle" via.airgapwidth=0
PolygonConnect PolygonConnect_In_GND_UM_L-01_P619 [IsNamedPolygon('GND_UM_L-01_P619')] p452: thpad.connectstyle=Relief thpad.reliefconductorwidth=19.68 thpad.reliefentries=4 thpad.polygonreliefangle="90 Angle" thpad.airgapwidth=9.84 smdpad.connectstyle=Relief smdpad.reliefconductorwidth=19.68 smdpad.reliefentries=4 smdpad.polygonreliefangle="90 Angle" smdpad.airgapwidth=9.84 via.connectstyle=Direct via.reliefconductorwidth=5.12 via.reliefentries=2 via.polygonreliefangle="90 Angle" via.airgapwidth=0
PolygonConnect PolygonConnect_In_$2N2408_L01_P160 [IsNamedPolygon('$2N2408_L01_P160')] p453: thpad.connectstyle=Relief thpad.reliefconductorwidth=19.68 thpad.reliefentries=4 thpad.polygonreliefangle="90 Angle" thpad.airgapwidth=9.84 smdpad.connectstyle=Relief smdpad.reliefconductorwidth=19.68 smdpad.reliefentries=4 smdpad.polygonreliefangle="90 Angle" smdpad.airgapwidth=9.84 via.connectstyle=Direct via.reliefconductorwidth=5.12 via.reliefentries=2 via.polygonreliefangle="90 Angle" via.airgapwidth=0
PolygonConnect PolygonConnect_In_PGND_L-01_P210 [IsNamedPolygon('PGND_L-01_P210')] p454: thpad.connectstyle=Relief thpad.reliefconductorwidth=19.68 thpad.reliefentries=4 thpad.polygonreliefangle="90 Angle" thpad.airgapwidth=9.84 smdpad.connectstyle=Relief smdpad.reliefconductorwidth=19.68 smdpad.reliefentries=4 smdpad.polygonreliefangle="90 Angle" smdpad.airgapwidth=9.84 via.connectstyle=Direct via.reliefconductorwidth=5.12 via.reliefentries=2 via.polygonreliefangle="90 Angle" via.airgapwidth=0
PolygonConnect PolygonConnect_In_+15V_L-01_P476 [IsNamedPolygon('+15V_L-01_P476')] p455: thpad.connectstyle=Relief thpad.reliefconductorwidth=19.68 thpad.reliefentries=4 thpad.polygonreliefangle="90 Angle" thpad.airgapwidth=9.84 smdpad.connectstyle=Relief smdpad.reliefconductorwidth=19.68 smdpad.reliefentries=4 smdpad.polygonreliefangle="90 Angle" smdpad.airgapwidth=9.84 via.connectstyle=Direct via.reliefconductorwidth=5.12 via.reliefentries=2 via.polygonreliefangle="90 Angle" via.airgapwidth=0
PolygonConnect PolygonConnect_In_PGND_L-01_P295 [IsNamedPolygon('PGND_L-01_P295')] p456: thpad.connectstyle=Relief thpad.reliefconductorwidth=19.68 thpad.reliefentries=4 thpad.polygonreliefangle="90 Angle" thpad.airgapwidth=9.84 smdpad.connectstyle=Relief smdpad.reliefconductorwidth=19.68 smdpad.reliefentries=4 smdpad.polygonreliefangle="90 Angle" smdpad.airgapwidth=9.84 via.connectstyle=Direct via.reliefconductorwidth=5.12 via.reliefentries=2 via.polygonreliefangle="90 Angle" via.airgapwidth=0
PolygonConnect PolygonConnect_In_PGND_L-01_P294 [IsNamedPolygon('PGND_L-01_P294')] p457: thpad.connectstyle=Relief thpad.reliefconductorwidth=19.68 thpad.reliefentries=4 thpad.polygonreliefangle="90 Angle" thpad.airgapwidth=9.84 smdpad.connectstyle=Relief smdpad.reliefconductorwidth=19.68 smdpad.reliefentries=4 smdpad.polygonreliefangle="90 Angle" smdpad.airgapwidth=9.84 via.connectstyle=Direct via.reliefconductorwidth=5.12 via.reliefentries=2 via.polygonreliefangle="90 Angle" via.airgapwidth=0
PolygonConnect PolygonConnect_In_$6N135_L01_P103 [IsNamedPolygon('$6N135_L01_P103')] p458: thpad.connectstyle=Relief thpad.reliefconductorwidth=19.68 thpad.reliefentries=4 thpad.polygonreliefangle="90 Angle" thpad.airgapwidth=9.84 smdpad.connectstyle=Relief smdpad.reliefconductorwidth=19.68 smdpad.reliefentries=4 smdpad.polygonreliefangle="90 Angle" smdpad.airgapwidth=9.84 via.connectstyle=Direct via.reliefconductorwidth=5.12 via.reliefentries=2 via.polygonreliefangle="90 Angle" via.airgapwidth=0
PolygonConnect PolygonConnect_In_PGND_L01_P296 [IsNamedPolygon('PGND_L01_P296')] p459: thpad.connectstyle=Relief thpad.reliefconductorwidth=19.68 thpad.reliefentries=4 thpad.polygonreliefangle="90 Angle" thpad.airgapwidth=9.84 smdpad.connectstyle=Relief smdpad.reliefconductorwidth=19.68 smdpad.reliefentries=4 smdpad.polygonreliefangle="90 Angle" smdpad.airgapwidth=9.84 via.connectstyle=Direct via.reliefconductorwidth=5.12 via.reliefentries=2 via.polygonreliefangle="90 Angle" via.airgapwidth=0
PolygonConnect PolygonConnect_In_$6N3156_L-01_P069 [IsNamedPolygon('$6N3156_L-01_P069')] p460: thpad.connectstyle=Relief thpad.reliefconductorwidth=19.68 thpad.reliefentries=4 thpad.polygonreliefangle="90 Angle" thpad.airgapwidth=9.84 smdpad.connectstyle=Relief smdpad.reliefconductorwidth=19.68 smdpad.reliefentries=4 smdpad.polygonreliefangle="90 Angle" smdpad.airgapwidth=9.84 via.connectstyle=Direct via.reliefconductorwidth=5.12 via.reliefentries=2 via.polygonreliefangle="90 Angle" via.airgapwidth=0
PolygonConnect PolygonConnect_In_GND_L01_P428 [IsNamedPolygon('GND_L01_P428')] p461: thpad.connectstyle=Relief thpad.reliefconductorwidth=19.68 thpad.reliefentries=4 thpad.polygonreliefangle="90 Angle" thpad.airgapwidth=9.84 smdpad.connectstyle=Relief smdpad.reliefconductorwidth=19.68 smdpad.reliefentries=4 smdpad.polygonreliefangle="90 Angle" smdpad.airgapwidth=9.84 via.connectstyle=Direct via.reliefconductorwidth=5.12 via.reliefentries=2 via.polygonreliefangle="90 Angle" via.airgapwidth=0
PolygonConnect PolygonConnect_In_$6N3156_L02_P079 [IsNamedPolygon('$6N3156_L02_P079')] p462: thpad.connectstyle=Relief thpad.reliefconductorwidth=19.68 thpad.reliefentries=4 thpad.polygonreliefangle="90 Angle" thpad.airgapwidth=9.84 smdpad.connectstyle=Relief smdpad.reliefconductorwidth=19.68 smdpad.reliefentries=4 smdpad.polygonreliefangle="90 Angle" smdpad.airgapwidth=9.84 via.connectstyle=Direct via.reliefconductorwidth=5.12 via.reliefentries=2 via.polygonreliefangle="90 Angle" via.airgapwidth=0
PolygonConnect PolygonConnect_In_$4N2806_L-01_P571 [IsNamedPolygon('$4N2806_L-01_P571')] p463: thpad.connectstyle=Relief thpad.reliefconductorwidth=19.68 thpad.reliefentries=4 thpad.polygonreliefangle="90 Angle" thpad.airgapwidth=9.84 smdpad.connectstyle=Relief smdpad.reliefconductorwidth=19.68 smdpad.reliefentries=4 smdpad.polygonreliefangle="90 Angle" smdpad.airgapwidth=9.84 via.connectstyle=Direct via.reliefconductorwidth=5.12 via.reliefentries=2 via.polygonreliefangle="90 Angle" via.airgapwidth=0
PolygonConnect PolygonConnect_In_GND_L01_P429 [IsNamedPolygon('GND_L01_P429')] p464: thpad.connectstyle=Relief thpad.reliefconductorwidth=19.68 thpad.reliefentries=4 thpad.polygonreliefangle="90 Angle" thpad.airgapwidth=9.84 smdpad.connectstyle=Relief smdpad.reliefconductorwidth=19.68 smdpad.reliefentries=4 smdpad.polygonreliefangle="90 Angle" smdpad.airgapwidth=9.84 via.connectstyle=Direct via.reliefconductorwidth=5.12 via.reliefentries=2 via.polygonreliefangle="90 Angle" via.airgapwidth=0
PolygonConnect PolygonConnect_In_$6N106_L02_P060 [IsNamedPolygon('$6N106_L02_P060')] p465: thpad.connectstyle=Relief thpad.reliefconductorwidth=19.68 thpad.reliefentries=4 thpad.polygonreliefangle="90 Angle" thpad.airgapwidth=9.84 smdpad.connectstyle=Relief smdpad.reliefconductorwidth=19.68 smdpad.reliefentries=4 smdpad.polygonreliefangle="90 Angle" smdpad.airgapwidth=9.84 via.connectstyle=Direct via.reliefconductorwidth=5.12 via.reliefentries=2 via.polygonreliefangle="90 Angle" via.airgapwidth=0
PolygonConnect PolygonConnect_In_$6N134_L01_P115 [IsNamedPolygon('$6N134_L01_P115')] p466: thpad.connectstyle=Relief thpad.reliefconductorwidth=19.68 thpad.reliefentries=4 thpad.polygonreliefangle="90 Angle" thpad.airgapwidth=9.84 smdpad.connectstyle=Relief smdpad.reliefconductorwidth=19.68 smdpad.reliefentries=4 smdpad.polygonreliefangle="90 Angle" smdpad.airgapwidth=9.84 via.connectstyle=Direct via.reliefconductorwidth=5.12 via.reliefentries=2 via.polygonreliefangle="90 Angle" via.airgapwidth=0
PolygonConnect PolygonConnect_In_$4N4014_L-01_P561 [IsNamedPolygon('$4N4014_L-01_P561')] p467: thpad.connectstyle=Relief thpad.reliefconductorwidth=19.68 thpad.reliefentries=4 thpad.polygonreliefangle="90 Angle" thpad.airgapwidth=9.84 smdpad.connectstyle=Relief smdpad.reliefconductorwidth=19.68 smdpad.reliefentries=4 smdpad.polygonreliefangle="90 Angle" smdpad.airgapwidth=9.84 via.connectstyle=Direct via.reliefconductorwidth=5.12 via.reliefentries=2 via.polygonreliefangle="90 Angle" via.airgapwidth=0
PolygonConnect PolygonConnect_In_GND_L01_P426 [IsNamedPolygon('GND_L01_P426')] p468: thpad.connectstyle=Relief thpad.reliefconductorwidth=19.68 thpad.reliefentries=4 thpad.polygonreliefangle="90 Angle" thpad.airgapwidth=9.84 smdpad.connectstyle=Relief smdpad.reliefconductorwidth=19.68 smdpad.reliefentries=4 smdpad.polygonreliefangle="90 Angle" smdpad.airgapwidth=9.84 via.connectstyle=Direct via.reliefconductorwidth=5.12 via.reliefentries=2 via.polygonreliefangle="90 Angle" via.airgapwidth=0
PolygonConnect PolygonConnect_In_+U_VENT_L01_P510 [IsNamedPolygon('+U_VENT_L01_P510')] p469: thpad.connectstyle=Relief thpad.reliefconductorwidth=19.68 thpad.reliefentries=4 thpad.polygonreliefangle="90 Angle" thpad.airgapwidth=9.84 smdpad.connectstyle=Relief smdpad.reliefconductorwidth=19.68 smdpad.reliefentries=4 smdpad.polygonreliefangle="90 Angle" smdpad.airgapwidth=9.84 via.connectstyle=Direct via.reliefconductorwidth=5.12 via.reliefentries=2 via.polygonreliefangle="90 Angle" via.airgapwidth=0
PolygonConnect PolygonConnect_In_$6N134_L-01_P108 [IsNamedPolygon('$6N134_L-01_P108')] p470: thpad.connectstyle=Relief thpad.reliefconductorwidth=19.68 thpad.reliefentries=4 thpad.polygonreliefangle="90 Angle" thpad.airgapwidth=9.84 smdpad.connectstyle=Relief smdpad.reliefconductorwidth=19.68 smdpad.reliefentries=4 smdpad.polygonreliefangle="90 Angle" smdpad.airgapwidth=9.84 via.connectstyle=Direct via.reliefconductorwidth=5.12 via.reliefentries=2 via.polygonreliefangle="90 Angle" via.airgapwidth=0
PolygonConnect PolygonConnect_In_~U_TP_L02_P355 [IsNamedPolygon('~U_TP_L02_P355')] p471: thpad.connectstyle=Relief thpad.reliefconductorwidth=19.68 thpad.reliefentries=4 thpad.polygonreliefangle="90 Angle" thpad.airgapwidth=9.84 smdpad.connectstyle=Relief smdpad.reliefconductorwidth=19.68 smdpad.reliefentries=4 smdpad.polygonreliefangle="90 Angle" smdpad.airgapwidth=9.84 via.connectstyle=Direct via.reliefconductorwidth=5.12 via.reliefentries=2 via.polygonreliefangle="90 Angle" via.airgapwidth=0
PolygonConnect PolygonConnect_In_$4N4005_L-01_P553 [IsNamedPolygon('$4N4005_L-01_P553')] p472: thpad.connectstyle=Relief thpad.reliefconductorwidth=19.68 thpad.reliefentries=4 thpad.polygonreliefangle="90 Angle" thpad.airgapwidth=9.84 smdpad.connectstyle=Relief smdpad.reliefconductorwidth=19.68 smdpad.reliefentries=4 smdpad.polygonreliefangle="90 Angle" smdpad.airgapwidth=9.84 via.connectstyle=Direct via.reliefconductorwidth=5.12 via.reliefentries=2 via.polygonreliefangle="90 Angle" via.airgapwidth=0
PolygonConnect PolygonConnect_In_PGND_L-01_P199 [IsNamedPolygon('PGND_L-01_P199')] p473: thpad.connectstyle=Relief thpad.reliefconductorwidth=19.68 thpad.reliefentries=4 thpad.polygonreliefangle="90 Angle" thpad.airgapwidth=9.84 smdpad.connectstyle=Relief smdpad.reliefconductorwidth=19.68 smdpad.reliefentries=4 smdpad.polygonreliefangle="90 Angle" smdpad.airgapwidth=9.84 via.connectstyle=Direct via.reliefconductorwidth=5.12 via.reliefentries=2 via.polygonreliefangle="90 Angle" via.airgapwidth=0
PolygonConnect PolygonConnect_In_-U_VENT_L-01_P530 [IsNamedPolygon('-U_VENT_L-01_P530')] p474: thpad.connectstyle=Relief thpad.reliefconductorwidth=19.68 thpad.reliefentries=4 thpad.polygonreliefangle="90 Angle" thpad.airgapwidth=9.84 smdpad.connectstyle=Relief smdpad.reliefconductorwidth=19.68 smdpad.reliefentries=4 smdpad.polygonreliefangle="90 Angle" smdpad.airgapwidth=9.84 via.connectstyle=Direct via.reliefconductorwidth=5.12 via.reliefentries=2 via.polygonreliefangle="90 Angle" via.airgapwidth=0
PolygonConnect PolygonConnect_In_+U_UM_L01_P489 [IsNamedPolygon('+U_UM_L01_P489')] p475: thpad.connectstyle=Relief thpad.reliefconductorwidth=19.68 thpad.reliefentries=4 thpad.polygonreliefangle="90 Angle" thpad.airgapwidth=9.84 smdpad.connectstyle=Relief smdpad.reliefconductorwidth=19.68 smdpad.reliefentries=4 smdpad.polygonreliefangle="90 Angle" smdpad.airgapwidth=9.84 via.connectstyle=Direct via.reliefconductorwidth=5.12 via.reliefentries=2 via.polygonreliefangle="90 Angle" via.airgapwidth=0
PolygonConnect PolygonConnect_In_U_FIN_L01_P143 [IsNamedPolygon('U_FIN_L01_P143')] p476: thpad.connectstyle=Relief thpad.reliefconductorwidth=19.68 thpad.reliefentries=4 thpad.polygonreliefangle="90 Angle" thpad.airgapwidth=9.84 smdpad.connectstyle=Relief smdpad.reliefconductorwidth=19.68 smdpad.reliefentries=4 smdpad.polygonreliefangle="90 Angle" smdpad.airgapwidth=9.84 via.connectstyle=Direct via.reliefconductorwidth=5.12 via.reliefentries=2 via.polygonreliefangle="90 Angle" via.airgapwidth=0
PolygonConnect PolygonConnect_In_UL_L-01_P372 [IsNamedPolygon('UL_L-01_P372')] p477: thpad.connectstyle=Relief thpad.reliefconductorwidth=19.68 thpad.reliefentries=4 thpad.polygonreliefangle="90 Angle" thpad.airgapwidth=9.84 smdpad.connectstyle=Relief smdpad.reliefconductorwidth=19.68 smdpad.reliefentries=4 smdpad.polygonreliefangle="90 Angle" smdpad.airgapwidth=9.84 via.connectstyle=Direct via.reliefconductorwidth=5.12 via.reliefentries=2 via.polygonreliefangle="90 Angle" via.airgapwidth=0
PolygonConnect PolygonConnect_In_GND_L-01_P391 [IsNamedPolygon('GND_L-01_P391')] p478: thpad.connectstyle=Relief thpad.reliefconductorwidth=19.68 thpad.reliefentries=4 thpad.polygonreliefangle="90 Angle" thpad.airgapwidth=9.84 smdpad.connectstyle=Relief smdpad.reliefconductorwidth=19.68 smdpad.reliefentries=4 smdpad.polygonreliefangle="90 Angle" smdpad.airgapwidth=9.84 via.connectstyle=Direct via.reliefconductorwidth=5.12 via.reliefentries=2 via.polygonreliefangle="90 Angle" via.airgapwidth=0
PolygonConnect PolygonConnect_In_UL_L01_P369 [IsNamedPolygon('UL_L01_P369')] p479: thpad.connectstyle=Relief thpad.reliefconductorwidth=19.68 thpad.reliefentries=4 thpad.polygonreliefangle="90 Angle" thpad.airgapwidth=9.84 smdpad.connectstyle=Relief smdpad.reliefconductorwidth=19.68 smdpad.reliefentries=4 smdpad.polygonreliefangle="90 Angle" smdpad.airgapwidth=9.84 via.connectstyle=Direct via.reliefconductorwidth=5.12 via.reliefentries=2 via.polygonreliefangle="90 Angle" via.airgapwidth=0
PolygonConnect PolygonConnect_In_U_FIN_L-01_P140 [IsNamedPolygon('U_FIN_L-01_P140')] p480: thpad.connectstyle=Relief thpad.reliefconductorwidth=19.68 thpad.reliefentries=4 thpad.polygonreliefangle="90 Angle" thpad.airgapwidth=9.84 smdpad.connectstyle=Relief smdpad.reliefconductorwidth=19.68 smdpad.reliefentries=4 smdpad.polygonreliefangle="90 Angle" smdpad.airgapwidth=9.84 via.connectstyle=Direct via.reliefconductorwidth=5.12 via.reliefentries=2 via.polygonreliefangle="90 Angle" via.airgapwidth=0
PolygonConnect PolygonConnect_In_-U_AMP_L-01_P010 [IsNamedPolygon('-U_AMP_L-01_P010')] p481: thpad.connectstyle=Relief thpad.reliefconductorwidth=19.68 thpad.reliefentries=4 thpad.polygonreliefangle="90 Angle" thpad.airgapwidth=9.84 smdpad.connectstyle=Relief smdpad.reliefconductorwidth=19.68 smdpad.reliefentries=4 smdpad.polygonreliefangle="90 Angle" smdpad.airgapwidth=9.84 via.connectstyle=Direct via.reliefconductorwidth=5.12 via.reliefentries=2 via.polygonreliefangle="90 Angle" via.airgapwidth=0
PolygonConnect PolygonConnect_In_PGND_L01_P282 [IsNamedPolygon('PGND_L01_P282')] p482: thpad.connectstyle=Relief thpad.reliefconductorwidth=19.68 thpad.reliefentries=4 thpad.polygonreliefangle="90 Angle" thpad.airgapwidth=9.84 smdpad.connectstyle=Relief smdpad.reliefconductorwidth=19.68 smdpad.reliefentries=4 smdpad.polygonreliefangle="90 Angle" smdpad.airgapwidth=9.84 via.connectstyle=Direct via.reliefconductorwidth=5.12 via.reliefentries=2 via.polygonreliefangle="90 Angle" via.airgapwidth=0
PolygonConnect PolygonConnect_In_PGND_L-01_P205 [IsNamedPolygon('PGND_L-01_P205')] p483: thpad.connectstyle=Relief thpad.reliefconductorwidth=19.68 thpad.reliefentries=4 thpad.polygonreliefangle="90 Angle" thpad.airgapwidth=9.84 smdpad.connectstyle=Relief smdpad.reliefconductorwidth=19.68 smdpad.reliefentries=4 smdpad.polygonreliefangle="90 Angle" smdpad.airgapwidth=9.84 via.connectstyle=Direct via.reliefconductorwidth=5.12 via.reliefentries=2 via.polygonreliefangle="90 Angle" via.airgapwidth=0
PolygonConnect PolygonConnect_In_GND_UM_L02_P616 [IsNamedPolygon('GND_UM_L02_P616')] p484: thpad.connectstyle=Relief thpad.reliefconductorwidth=19.68 thpad.reliefentries=4 thpad.polygonreliefangle="90 Angle" thpad.airgapwidth=9.84 smdpad.connectstyle=Relief smdpad.reliefconductorwidth=19.68 smdpad.reliefentries=4 smdpad.polygonreliefangle="90 Angle" smdpad.airgapwidth=9.84 via.connectstyle=Direct via.reliefconductorwidth=5.12 via.reliefentries=2 via.polygonreliefangle="90 Angle" via.airgapwidth=0